# Altium PCB PCB_Flex_USB_v2.3.PcbDoc
Units mm, origin at the board's own origin, x right, y up, seen from the top; angles counter-clockwise.
Board outline 9 x 55.01 mm, 2 copper layers (Top Layer, Bottom Layer), stack 0.095 mm thick; 8 components, 4 nets, 8 pads, 0 vias.
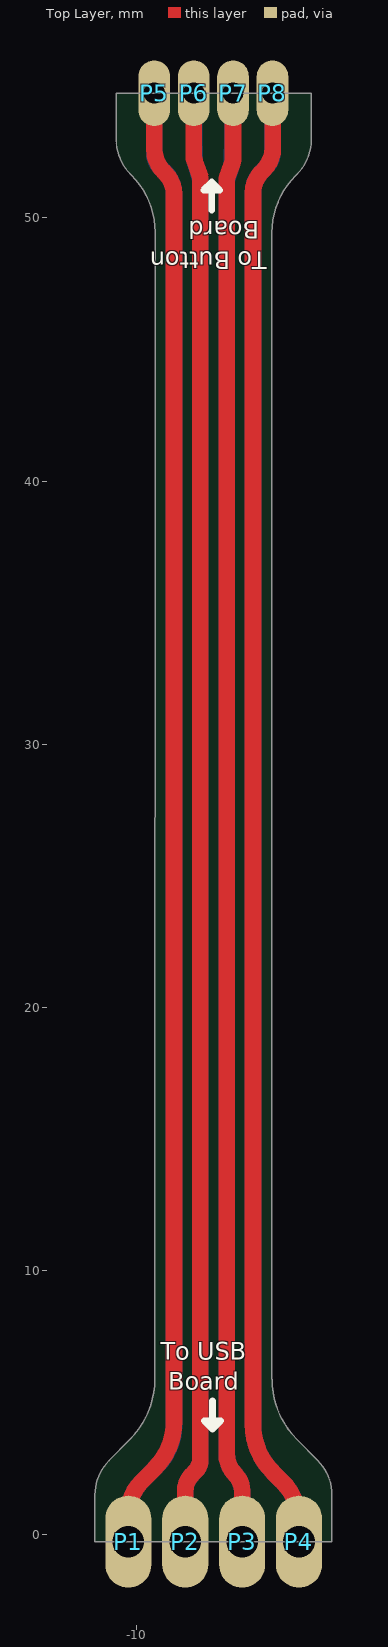
[diagram p0: Top Layer view]
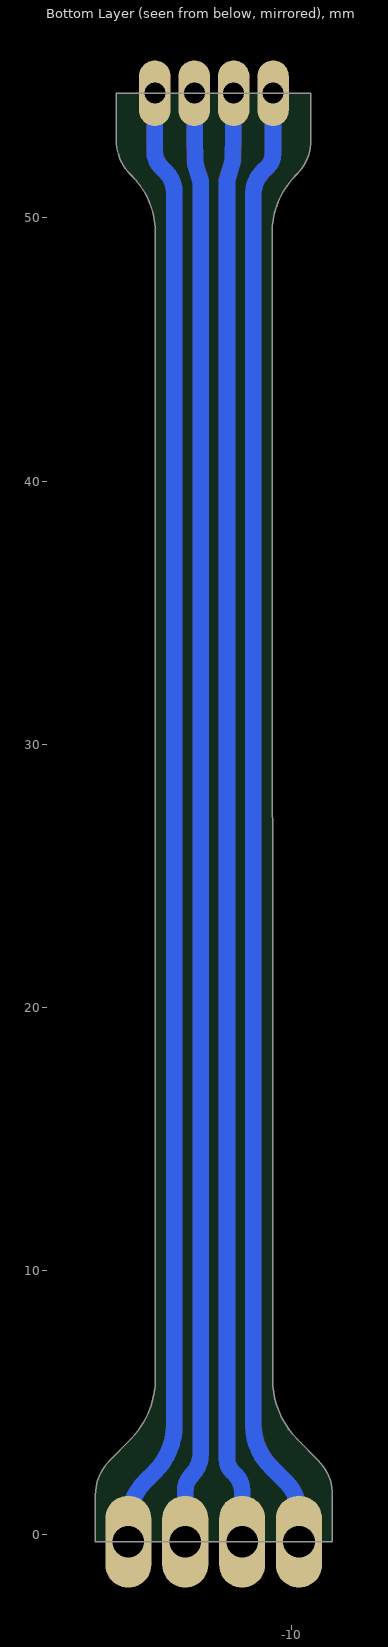
[diagram p1: Bottom Layer view, seen from below]

## Layer stack, top to bottom
Top Solder: solder mask 0.0127, Solder Resist, Dk 3.5
Top Layer: signal copper 0.035
Dielectric 1: core 0.0254, Polyimide, Dk 3.5
Bottom Layer: signal copper 0.035
Bottom Solder: solder mask 0.0127, Solder Resist, Dk 3.5

## Board outline
-11.572,-0.28 -11.572,1.498 cw(c-9.733,1.498) -11.034,2.799 -10.247,3.603 ccw(c-12.534,5.89) -9.299,5.89 -9.286,48.563 -9.285,48.563 -9.285,49.45 ccw(c-12.351,49.45) -10.183,51.618 -10.22,51.654 cw(c-8.919,52.955) -10.759,52.955 -10.759,54.733 -3.359,54.733 -3.359,52.955 cw(c-5.198,52.955) -3.898,51.654 -3.953,51.599 ccw(c-1.785,49.431) -4.851,49.431 -4.851,48.7 -4.851,5.89 -4.846,5.89 ccw(c-1.611,5.89) -3.898,3.603 -3.111,2.799 cw(c-4.412,1.498) -2.572,1.498 -2.572,-0.28

## Design rules (kind name [scope] priority, off if disabled: settings)
Clearance [All] p1: gap=0.254 ignorepadtopadclearanceinfootprint=FALSE except(0: Arc-Hole Track-Hole SMDPad-Hole THPad-Hole Via-Hole Fill-Hole Poly-Hole Region-Hole Text-Hole)
ComponentClearance [All] p1: gap=0 collisioncheckmode=3 verticalgap=0 showdistances=FALSE
HoleToHoleClearance [All] p1: gap=0 allowstackedmicrovias=TRUE
MinimumSolderMaskSliver [All] p1: minsoldermaskwidth=0
PolygonConnect [All] p1: connectstyle=Relief reliefconductorwidth=0.254 reliefentries=4 polygonreliefangle="90 Angle" airgapwidth=0.254
RoutingVias [All] p1: holewidth=0.3 width=0.6 viastyle="Through Hole" minholewidth=0.3 minwidth=0.6 maxholewidth=0.3 maxwidth=0.6
SilkToSilkClearance [All] p1: silktosilkclearance=0
SilkToSolderMaskClearance [IsPad] p1: minsilkscreentomaskgap=0 clearancetoexposedcopper=TRUE
SolderMaskExpansion [All] p1: expansion=0.102 istentingtop=FALSE
Width [All] p1: maxlimit=0.635 minlimit=0.254 preferedwidth=0.254 minimp=50.000000 maximp=50.000000 favimp=50.000000
25 further rules are at their usual default settings.

## Classes and differential pairs
component class Flex-USB: P1 P2 P7 P8

## Components (designator, comment, footprint, x,y, rotation, side; value= is the part's Value field where it differs from the comment)
P1 "0.5mm Test Pad" "0.5mm Test Pad"#1 -10.302,-0.28 r270 top
P2 "0.5mm Test Pad" "0.5mm Test Pad"#1 -8.142,-0.28 r270 top
P3 "0.5mm Test Pad" "0.5mm Test Pad"#2 -5.982,-0.28 r180 top
P4 "0.5mm Test Pad" "0.5mm Test Pad"#3 -0.508,-6.604 r180 top
P5 "0.5mm Test Pad" "0.5mm Test Pad"#4 -9.318,54.733 r180 top
P6 "0.5mm Test Pad" "0.5mm Test Pad"#4 -7.82,54.733 r0 top
P7 "0.5mm Test Pad" "0.5mm Test Pad"#5 -7.82,54.733 r180 top
P8 "0.5mm Test Pad" "0.5mm Test Pad"#4 -4.828,54.733 r180 top

## Footprints (in the part's own frame and the unit in brackets; to place one, negate y for a bottom-side part, rotate by r counter-clockwise, add the part's x,y. Pads: shape width x height; smd on the part's side, far side on the other; paste and mask are expansions set on the pad)
"0.5mm Test Pad"#1 [mm]
  oval 3.5x1.75 hole 1.2: 1(0,0)
"0.5mm Test Pad"#2 [mm]
  oval 1.75x3.5 hole 1.2: 1(0,0)
"0.5mm Test Pad"#3 [mm]
  oval 1.75x3.5 hole 1.2: 1(3.314,-6.324)
"0.5mm Test Pad"#4 [mm]
  oval 1.2x2.5 hole 0.8: 1(0,0)
"0.5mm Test Pad"#5 [mm]
  oval 1.2x2.5 hole 0.8: 1(-1.493,0)

## Part data
P1 P2 P3 P4 P5 P6 P7 P8: "Test pad"

## Nets (pads, with @x,y where several pads share a name; then routed paths per layer and width w, separated by ;. In a path a pad name is that pad's centre, name@x,y a point inside that pad or via, vN(x,y) a via of type N, cw(c..) or ccw(c..) an arc to the next point about the centre after c; other vN are vias at no path point)
NetP1_1: P1.1 P5.1 | length 111.4
  Top Layer w0.635: P1.1 -10.302,0.78 cw(c-8.568,0.78) -9.794,2.006 -9.312,2.489 ccw(c-11.108,4.285) -8.568,4.285 -8.568,4.585 ; P5.1 -9.318,52.601 ccw(c-8.149,52.601) -8.976,51.774 -8.894,51.692 cw(c-9.681,50.904) -8.568,50.904 -8.568,49.912 ; -8.568,4.572 -8.568,50.803 -8.568,50.905
  Bottom Layer w0.635: P1.1@-10.302,0.78 cw(c-8.568,0.78) -9.794,2.006 -9.206,2.594 ccw(c-10.745,4.135) -8.568,4.135 -8.568,50.8 ; P5.1 -9.318,52.425 ccw(c-8.653,52.425) -9.123,51.954 -8.921,51.751 cw(c-9.772,50.9) -8.568,50.9
NetP2_1: P2.1 P6.1 | length 110.4
  Top Layer w0.635: P2.1 -8.142,1.641 cw(c-7.267,1.641) -7.886,2.26 -7.767,2.379 ccw(c-8.249,2.861) -7.568,2.861 -7.568,51.527 -7.784,52.146 cw(c-7.185,52.356) -7.82,52.356 P6.1
  Bottom Layer w0.635: P2.1 -8.142,1.641 cw(c-7.267,1.641) -7.886,2.26 -7.767,2.379 ccw(c-8.249,2.861) -7.568,2.861 -7.568,51.4 -7.761,52.064 -7.761,52.065 cw(c-7.151,52.241) -7.786,52.229 -7.82,54.083 P6.1
NetP3_1: P3.1 P7.1 | length 112.2
  Top Layer w0.635: -6.568,51.502 -6.568,3.055 ccw(c-5.444,3.055) -6.238,2.26 cw(c-6.857,1.641) -5.982,1.641 P3.1 ; -6.568,51.502 -6.367,52.039 -6.366,52.041 ccw(c-6.962,52.262) -6.327,52.262 ; P7.1 P7.1@-6.327,54.083 ; -6.327,52.262 P7.1@-6.327,54.083 ; -6.327,52.262 P7.1@-6.327,54.083
  Bottom Layer w0.635: P7.1 -6.327,54.083 -6.365,52.127 cw(c-7,52.14) -6.393,51.954 -6.568,51.382 -6.568,51.009 -6.568,4.585 -6.568,3.055 ccw(c-5.444,3.055) -6.238,2.26 cw(c-6.857,1.641) -5.982,1.641 P3.1
NetP4_1: P4.1 P8.1 | length 110.5
  Top Layer w0.635: -5.242,51.74 ccw(c-4.454,50.953) -5.568,50.953 -5.568,4.165 ccw(c-3.028,4.165) -4.824,2.369 -4.46,2.006 cw(c-6.002,0.465) -3.822,0.465 P4.1 ; -5.16,51.822 ccw(c-5.986,52.649) -4.817,52.649 P8.1@-4.817,54.706
  Bottom Layer w0.635: -5.568,50.8 -5.568,4.165 ccw(c-3.028,4.165) -4.824,2.369 -4.46,2.006 cw(c-6.002,0.465) P4.1@-3.822,0.465 ; -5.568,50.962 cw(c-4.432,50.962) -5.235,51.765 ; -5.235,51.765 -5.046,51.954 ccw(c-5.571,52.479) -4.828,52.479 P8.1

## Silkscreen, mask and mechanical layers (free items; w line width, h text height)
Top Overlay:
  lines w0.254: -7.137,50.297 -7.137,51.357 ; -7.104,5.061 -7.104,4.001 ; -7.137,51.357 -6.832,51.052 -7.442,51.052 -7.137,51.357 ; -7.104,4.001 -7.408,4.306 -6.799,4.306 -7.104,4.001
  text "To Button /  Board" at -5.047,50.09 h1.14 r180
  text "To USB /  Board" at -9.065,5.263 h1.14
Board Outline:
  the board outline again, w0.254
Fabrication info:
  drawing of 193 lines, arcs and shapes, not listed
  text "Layer" at 59.736,55.329 h1.52
  text "Name" at 70.148,55.329 h1.52
  text "Material" at 93.763,55.329 h1.52
  text "Thickness" at 115.601,55.329 h1.52
  text "Constant" at 132.107,55.329 h1.52
  text "Board Layer Stack" at 146.582,55.329 h1.52
  text "Stiffener Area: 4.5mm" at 2.939,52.89 h1.52
  text "Top Overlay" at 70.148,52.281 h1.52
  text "Top Solder" at 70.148,49.233 h1.52
  text "Solder Resist" at 93.763,49.233 h1.52
  text "0.50mil" at 115.601,49.233 h1.52
  text "3.5" at 132.107,49.233 h1.52
  text "1" at 59.736,46.185 h1.52
  text "Top Layer" at 70.148,46.185 h1.52
  text "1.38mil" at 115.601,46.185 h1.52
  text "Dielectric 1" at 70.148,43.137 h1.52
  text "Polyimide" at 93.763,43.137 h1.52
  text "1.00mil" at 115.601,43.137 h1.52
  text "3.5" at 132.107,43.137 h1.52
  text "2" at 59.736,40.089 h1.52
  text "Bottom Layer" at 70.148,40.089 h1.52
  text "1.38mil" at 115.601,40.089 h1.52
  text "Bottom Solder" at 70.148,37.041 h1.52
  text "Solder Resist" at 93.763,37.041 h1.52
  text "0.50mil" at 115.601,37.041 h1.52
  text "3.5" at 132.107,37.041 h1.52
  text "Note:" at 1.492,36.457 h1.52
  text "Bottom Overlay" at 70.148,33.993 h1.52
  text "Stiffener Material: Polyimide" at 1.339,33.535 h1.52
  text "Stiffener Thickness: 0.225 mm" at 1.371,31.097 h1.52
  text "Total board thickness:" at 59.736,30.945 h1.52
  text "4.76mil" at 115.601,30.945 h1.52
  text "Stiffener side: Bottom side of PCB" at 1.347,28.913 h1.52
  text "Total Thickness of PCB (0.3mm): Stiffener thickness + Layer Stackup thickness." at -0.618,18.066 h1.52
  text "Stiffener Area: 4.5mm" at 4.057,0.744 h1.52
Drill Drawing:
  circle w0.254: c-3.444,67.985 r0.847
  lines w0.254: -4.291,72.642 -2.598,72.642 -3.444,70.949 -4.291,72.642
  lines w0.381: -5.81,65.996 233.798,65.996 ; -5.81,73.616 233.798,73.616 ; 8.182,62.186 8.182,77.426 ; 20.371,62.186 20.371,77.426 ; 48.049,62.186 48.049,77.426 ; 60.899,62.186 60.899,77.426 ; 79.537,62.186 79.537,77.426 ; 117.626,62.186 117.626,77.426 ; 132.608,62.186 132.608,77.426 ; 151.551,62.186 151.551,77.426 ; 176.182,62.186 176.182,77.426 ; 198.172,62.186 198.172,77.426 ; -5.81,62.186 233.798,62.186 233.798,77.426 -5.81,77.426 -5.81,62.186
  text "Symbol" at -3.524,74.759 h1.83
  text "Count" at 9.325,74.759 h1.83
  text "Hole Size" at 21.514,74.759 h1.83
  text "Plated" at 49.192,74.759 h1.83
  text "Hole Type" at 62.042,74.759 h1.83
  text "Drill Layer Pair" at 80.68,74.759 h1.83
  text "Via/Pad" at 118.769,74.759 h1.83
  text "Pad Shape" at 133.751,74.759 h1.83
  text "Template" at 152.694,74.759 h1.83
  text "Hole Length" at 177.325,74.759 h1.83
  text "Routed Path Length" at 199.315,74.759 h1.83
  text "4" at 9.325,70.949 h1.52
  text "31.50mil (0.800mm)" at 21.514,70.949 h1.52
  text "PTH" at 49.192,70.949 h1.52
  text "Round" at 62.042,70.949 h1.52
  text "Top Layer - Bottom Layer" at 80.68,70.949 h1.52
  text "Pad" at 118.769,70.949 h1.52
  text "Rounded" at 133.751,70.949 h1.52
  text "(Mixed)" at 152.694,70.949 h1.52
  text "-" at 177.325,70.949 h1.52
  text "-" at 199.315,70.949 h1.52
  text "4" at 9.325,67.139 h1.52
  text "47.24mil (1.200mm)" at 21.514,67.139 h1.52
  text "PTH" at 49.192,67.139 h1.52
  text "Round" at 62.042,67.139 h1.52
  text "Top Layer - Bottom Layer" at 80.68,67.139 h1.52
  text "Pad" at 118.769,67.139 h1.52
  text "Rounded" at 133.751,67.139 h1.52
  text "r350_175h120r88" at 152.694,67.139 h1.52
  text "-" at 177.325,67.139 h1.52
  text "-" at 199.315,67.139 h1.52
  text "8 Total" at 9.325,63.329 h1.52

## Dimensions
-11.572,-0.28 to -10.759,54.733 on Dimension